# Altium PCB servo_shield.pcbdoc (part 1 of 2)
Units mil, origin at the board's own origin, x right, y up, seen from the top; angles counter-clockwise.
Board outline 4750.63 x 4655.55 mil, 4 copper layers (Top Layer, GND, PWR, Bottom Layer), stack 62.447 mil thick; 94 components, 126 nets, 466 pads, 102 vias.
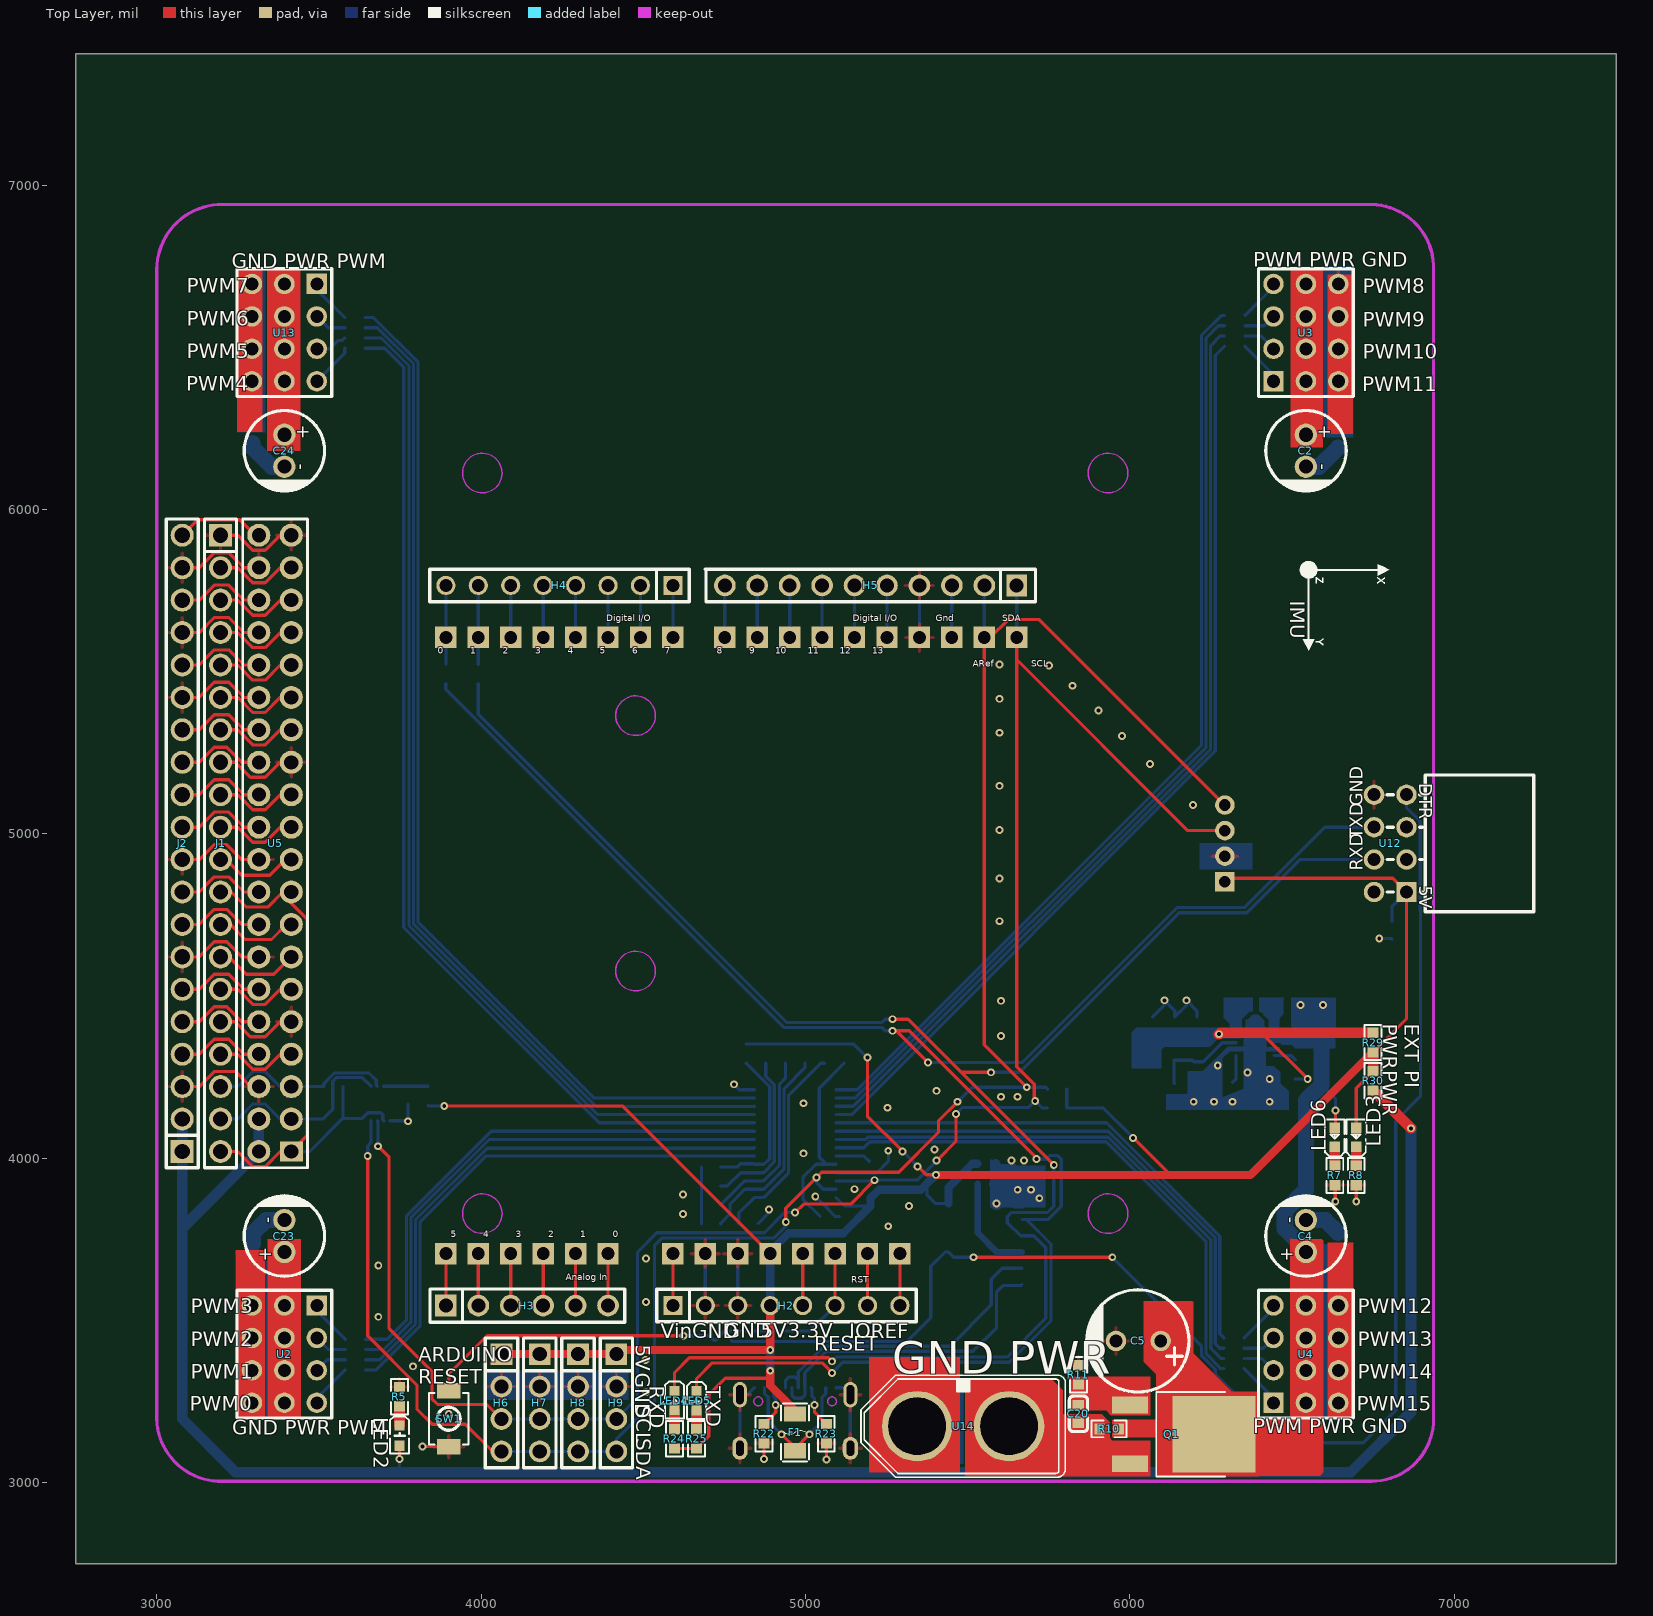
[diagram p0: Top Layer view]
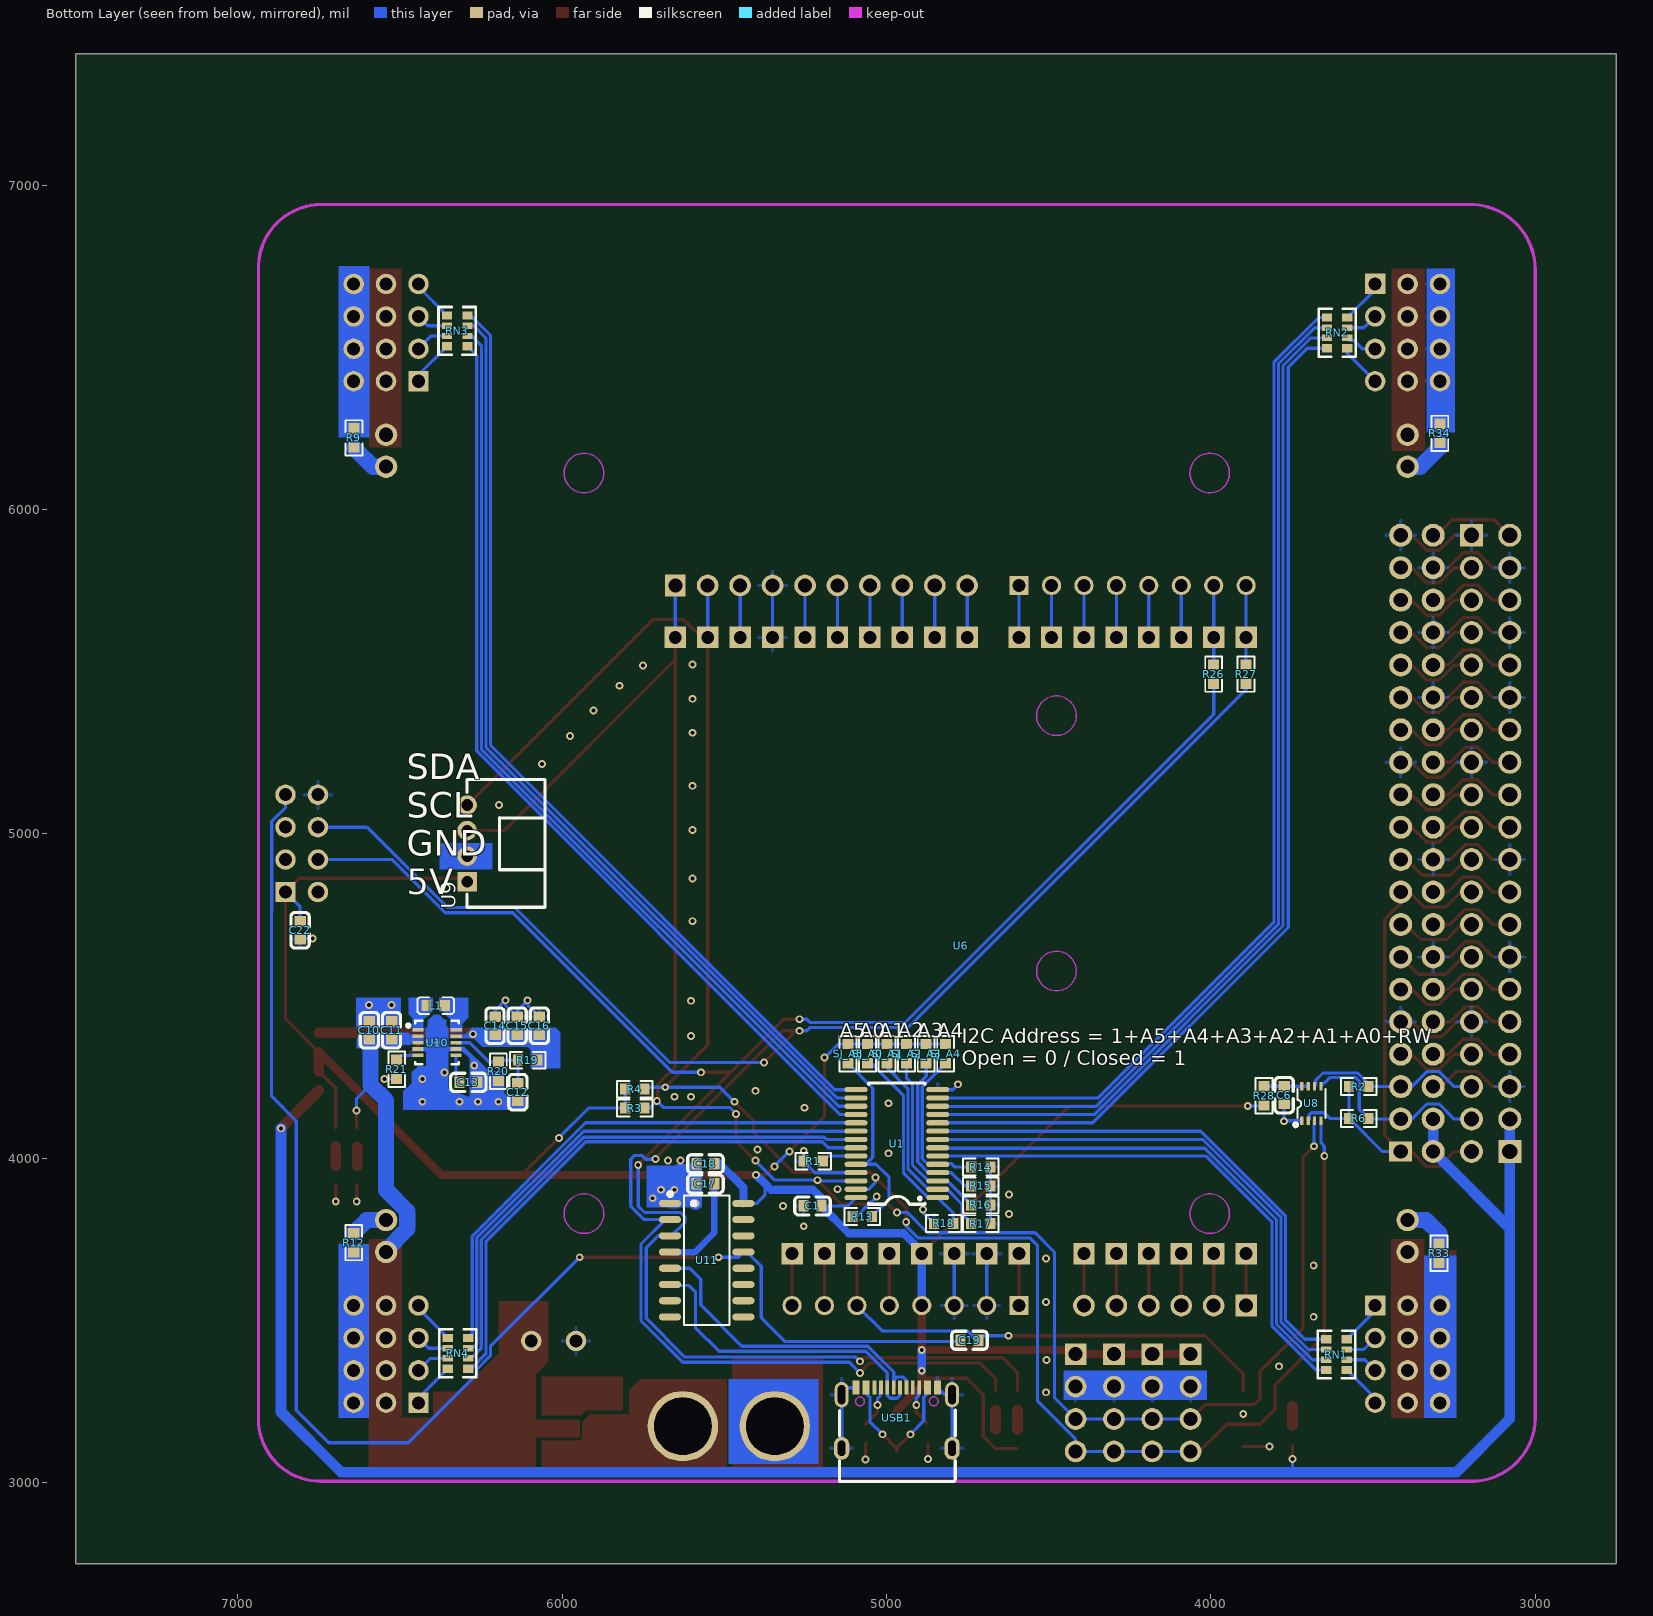
[diagram p1: Bottom Layer view, seen from below]
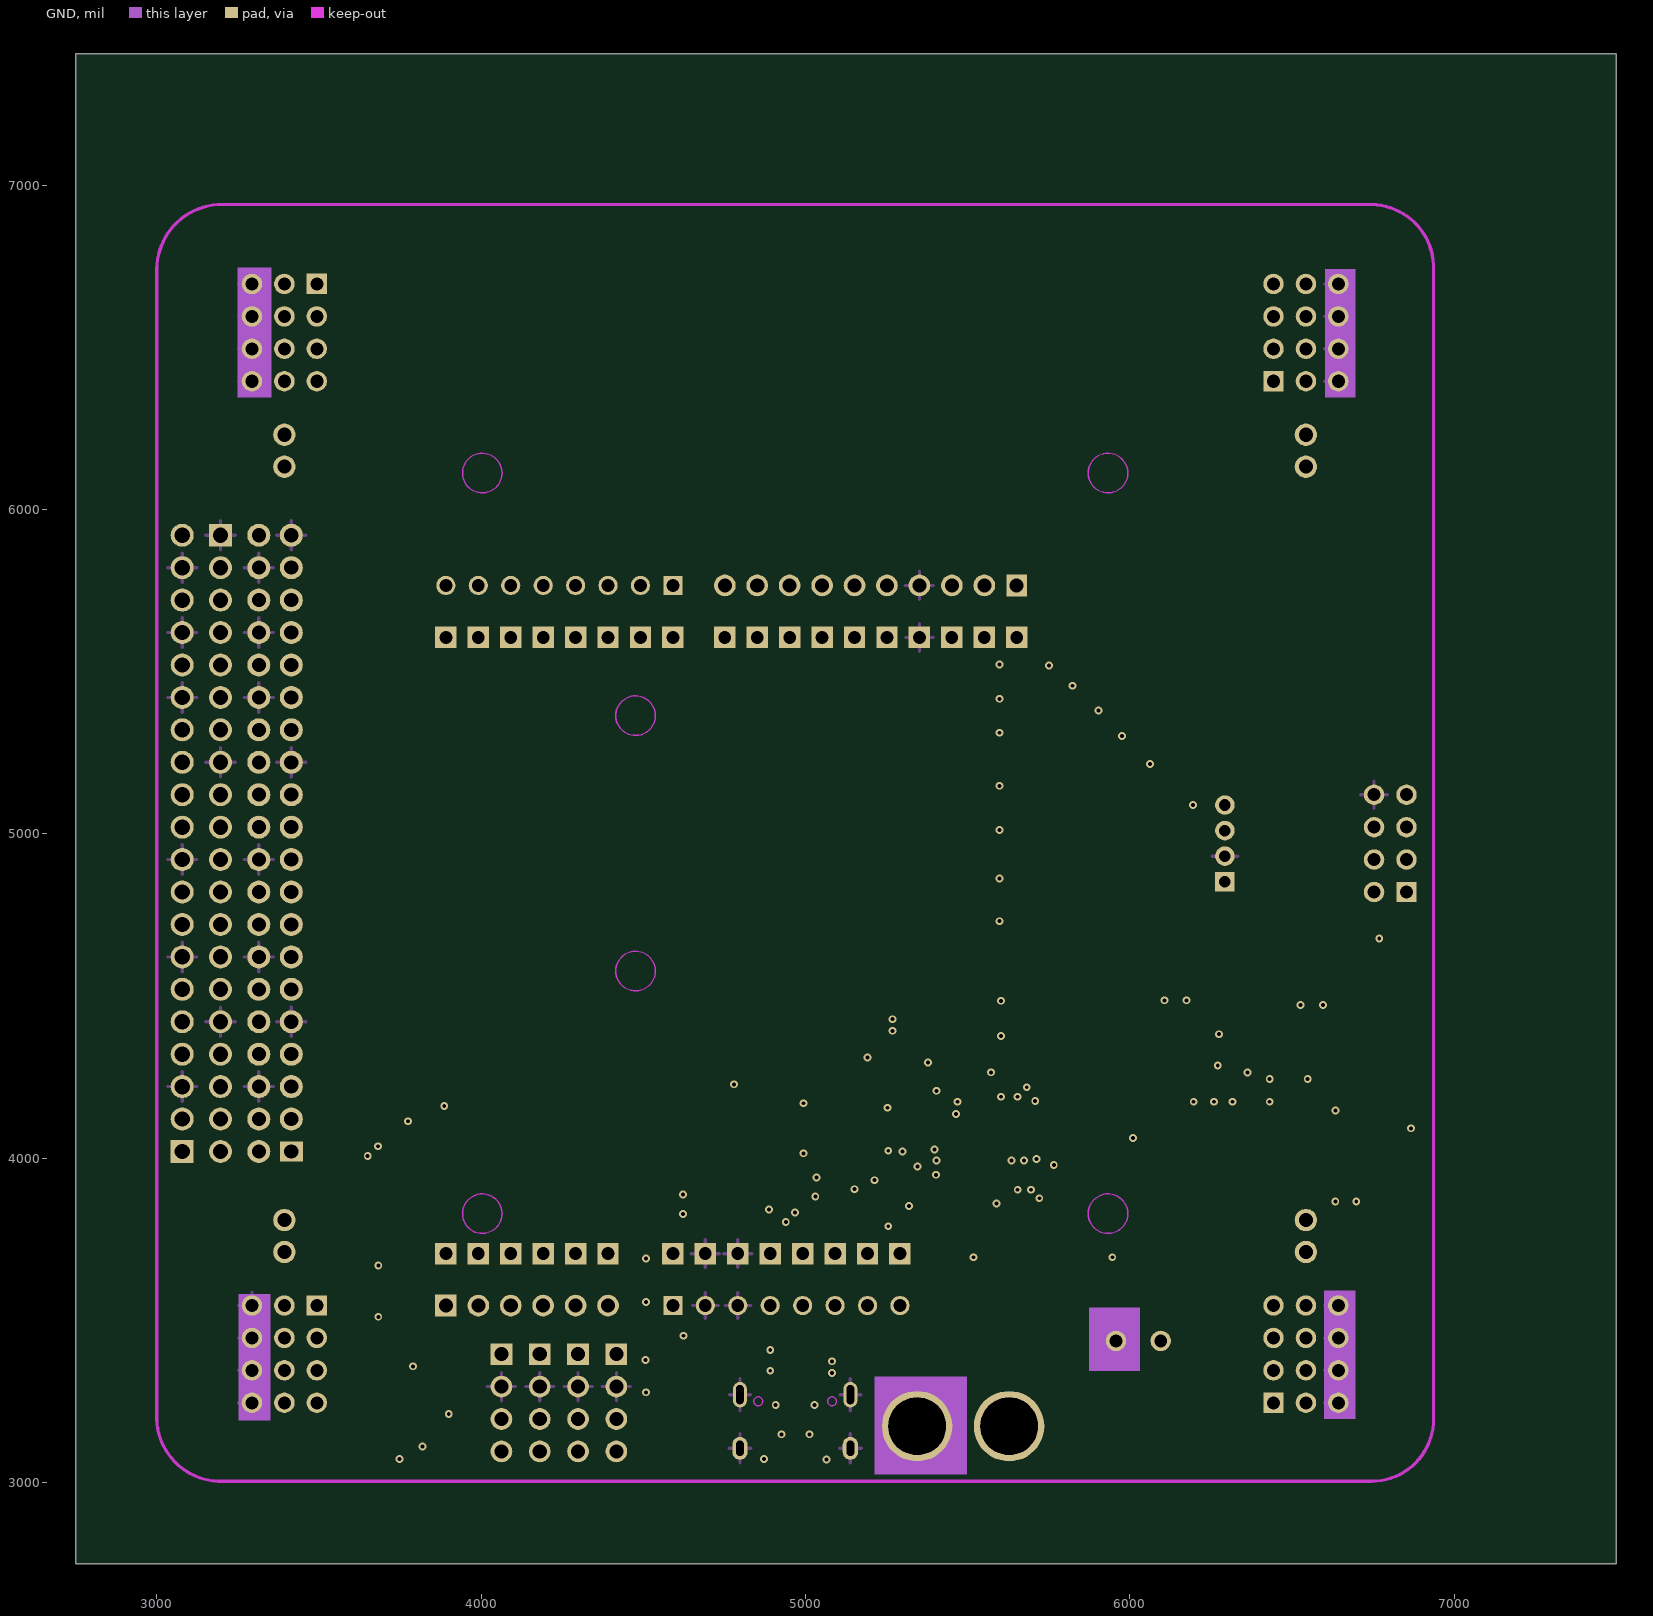
[diagram p2: GND]
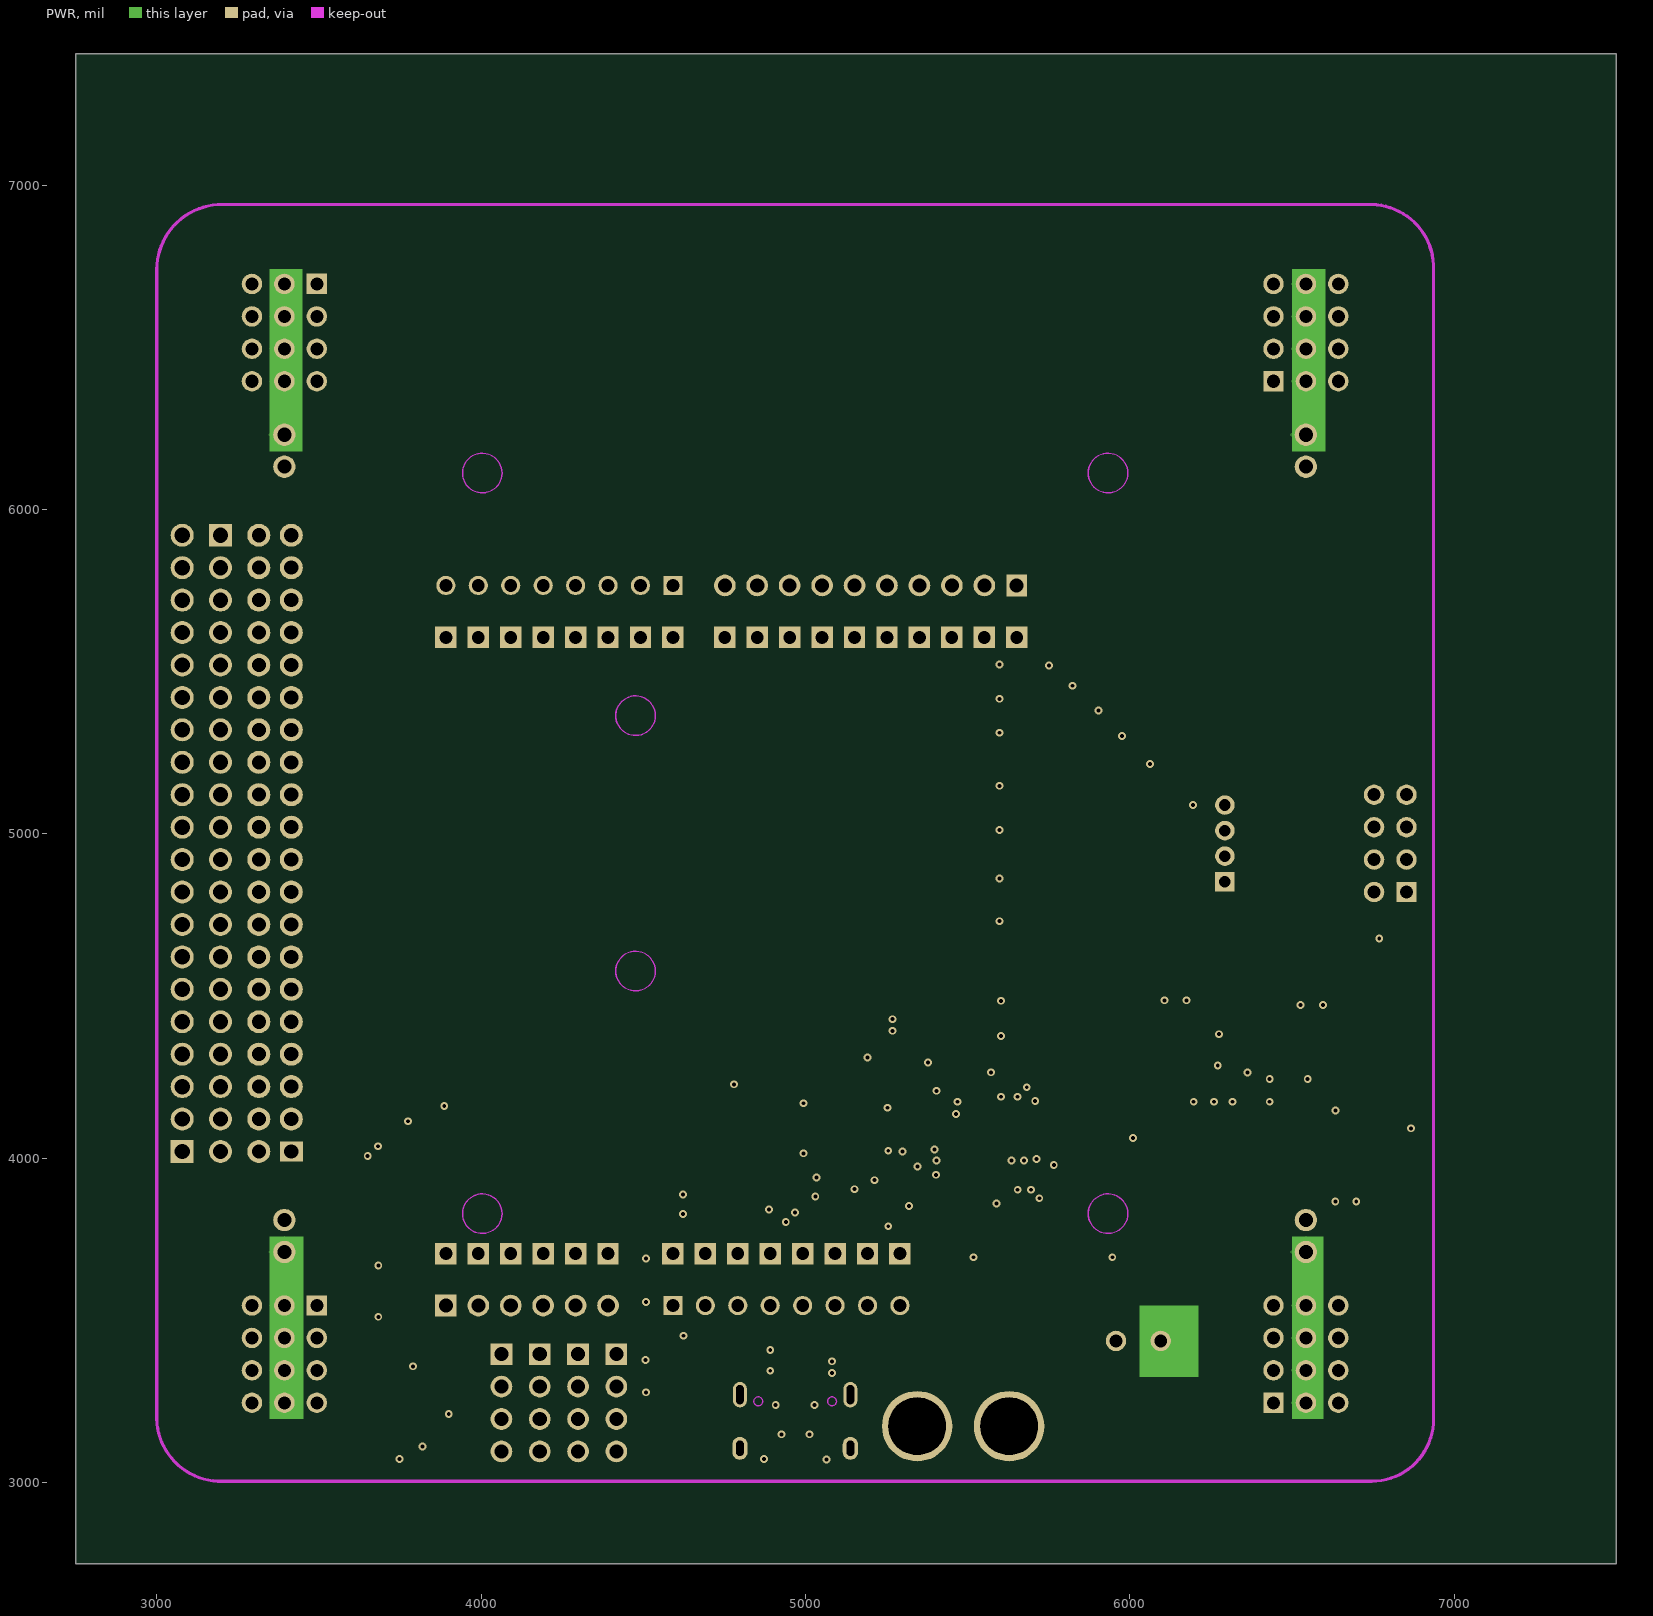
[diagram p3: PWR]

## Layer stack, top to bottom
Top Layer: signal copper 1.378
Dielectric1: surface 8.283, 7628 RC49% 8.6mil, Dk 0
GND: signal copper 0.598
Dielectric2: surface 41.929, 1.1mm H/HOZ Copper, Dk 0
PWR: signal copper 0.598
Dielectric3: surface 8.283, 7628 RC49% 8.6mil, Dk 0
Bottom Layer: signal copper 1.378

## Board outline
7500.63,2750 2750,2750 2750,7405.55 7500.63,7405.55

## Design rules (kind name [scope] priority, off if disabled: settings)
BoardOutlineClearance copperThickness1oz [All] p0: genericclearance=10 ignorepadtopadclearanceinfootprint=FALSE except(0: Arc-SplitContinuation Track-SplitContinuation SMDPad-SplitContinuation THPad-SplitContinuation Via-SplitContinuation Fill-SplitContinuation Poly-SplitContinuation Region-SplitContinuation Text-SplitContinuation)
BoardOutlineClearance copperThickness2oz [All] p0: genericclearance=10 ignorepadtopadclearanceinfootprint=FALSE except(0: Arc-SplitContinuation Track-SplitContinuation SMDPad-SplitContinuation THPad-SplitContinuation Via-SplitContinuation Fill-SplitContinuation Poly-SplitContinuation Region-SplitContinuation Text-SplitContinuation)
BoardOutlineClearance otherClearance [All] p0: genericclearance=10 ignorepadtopadclearanceinfootprint=FALSE except(0: Arc-SplitContinuation Track-SplitContinuation SMDPad-SplitContinuation THPad-SplitContinuation Via-SplitContinuation Fill-SplitContinuation Poly-SplitContinuation Region-SplitContinuation Text-SplitContinuation)
Clearance copperThickness1oz [All] p1: gap=7 ignorepadtopadclearanceinfootprint=FALSE
Clearance copperThickness2oz [All] p1: gap=7 ignorepadtopadclearanceinfootprint=FALSE
Clearance otherClearance [All] p1: gap=7 ignorepadtopadclearanceinfootprint=FALSE
DiffPairsRouting differentialPair [All] p1: maxuncoupledlength=10 minlimit=6 maxlimit=Infinity mostfreqgap=6 toplayer_minwidth=5 toplayer_prefwidth=10 toplayer_maxwidth=100 bottomlayer_minwidth=5 bottomlayer_prefwidth=10 bottomlayer_maxwidth=100 midlayer1_minwidth=5 midlayer1_prefwidth=10 midlayer1_maxwidth=100 midlayer2_minwidth=5 midlayer2_prefwidth=10 midlayer2_maxwidth=100
PasteMaskExpansion pasteMaskExpansion [All] p1: expansion=0
PlaneConnect innerPlane [All] p1: planeconnectstyle=Relief reliefexpansion=20 reliefentries=4 reliefconductorwidth=10 reliefairgap=10
PolygonConnect copperRegion [All] p1: connectstyle=Relief reliefentries=4 reliefconductorwidth=10 polygonreliefangle="90 Angle" airgapwidth=10
RoutingVias viaSize [All] p1: viastyle="Through Hole" holewidth=12.0078 minholewidth=11.811 maxholewidth=248.0314 width=12.0078 minwidth=11.811 maxwidth=248.0314
SolderMaskExpansion solderMaskExpansion [All] p1: useseparateexpansions=TRUE expansion=2 expansionbottom=2
Width copperThickness1oz [All] p1: maxlimit=100 minlimit=5 preferedwidth=10
Width copperThickness2oz [All] p1: maxlimit=100 minlimit=8 preferedwidth=10

## Components (designator, comment, footprint, x,y, rotation, side; value= is the part's Value field where it differs from the comment)
C1 "" C0603 5228.5,3852.51 r0 bottom
C2 "" CAP-TH_BD6.3-P2.50-D0.6-FD-1 6543.31,6181.14 r270 top
C4 "" CAP-TH_BD6.3-P2.50-D0.6-FD-1 6543.31,3759.88 r90 top
C5 "" CAP-TH_BD8.0-P3.50-D0.6-FD 6026.65,3436.5 r180 top
C6 "" C0603 3774.5,4194.11 r270 bottom
C10 "" C0603 6594.88,4394.25 r90 bottom
C11 "" C0603 6526.61,4394.25 r90 bottom
C12 "" C0603 6137.09,4203.5 r90 bottom
C13 "" C0603 6289.69,4233.62 r0 bottom
C14 "" C0603 6207.36,4408.31 r270 bottom
C15 "" C0603 6139.09,4408.31 r270 bottom
C16 "" C0603 6070.83,4408.31 r270 bottom
C17 "" C0603 5558.82,3920.39 r180 bottom
C18 "" C0603 5558.82,3982.64 r0 bottom
C19 "" C0603 4744.5,3438.51 r180 bottom
C20 "" C0603 5841.93,3211.61 r90 top
C22 "" C0603 6808.5,4702.51 r90 bottom
C23 "" CAP-TH_BD6.3-P2.50-D0.6-FD-1 3393.7,3759.88 r90 top
C24 "" CAP-TH_BD6.3-P2.50-D0.6-FD-1 3393.7,6181.14 r270 top
F1 "" F1206 4968.5,3154.51 r270 top
H2 "" HDR-TH_8P-P2.54-V-M 4941.65,3545.51 r0 top
H3 "" HDR-TH_6P-P2.54-V-M 4141.65,3545.51 r0 top
H4 "" HDR-TH_8P-P2.54-V-M 4241.65,5765.63 r180 top
H5 "" HDR-TH_10P-P2.54-V-M 5201.65,5765.63 r180 top
H6 "" HDR-TH_4P-P2.54-V-M 4062.99,3245.71 r270 top
H7 "" HDR-TH_4P-P2.54-V-M 4181.1,3245.71 r270 top
H8 "" HDR-TH_4P-P2.54-V-M 4299.21,3245.71 r270 top
H9 "" HDR-TH_4P-P2.54-V-M 4417.32,3245.71 r270 top
J1 "" HDR-TH_20P-P2.54-V-M-1 3196.85,4970.51 r270 top
J2 "" HDR-TH_20P-P2.54-V-M-1 3078.74,4970.51 r90 top
L1 "" L0603 6390.08,4470.55 r180 bottom
LED2 "" LED0603-R-RD_WHITE 3748.5,3144.51 r270 top
LED3 "" LED0603-RD 6698.5,4064.51 r90 top
LED4 "" LED0603-RD 4596.5,3252.61 r270 top
LED5 "" LED0603-R-RD 4664.5,3252.51 r270 top
LED6 "" LED0603-RD 6632.5,4064.51 r90 top
Q1 "" TO-252-2_L6.6-W6.1-P4.60-LS10.0-BR-CW 6130.3,3148.47 r180 top
R1 "" R0603 5226.5,3990.51 r0 bottom
R2 "" R0603 3544.5,4220.51 r0 bottom
R3 "" R0603 5776.5,4154.51 r0 bottom
R4 "" R0603 5776.5,4212.51 r0 bottom
R5 "" R0603 3748.5,3264.51 r90 top
R6 "" R0603 3544.5,4122.51 r0 bottom
R7 "" R0603 6632.5,3946.51 r270 top
R8 "" R0603 6698.5,3946.51 r270 top
R9 "" R0603 6642.5,6220.51 r270 bottom
R10 "" R0603 5936.3,3165.43 r180 top
R11 "" R0603 5841.93,3332.09 r270 top
R12 "" R0603 6643.07,3739.69 r90 bottom
R13 "" R0603 5074.92,3820 r180 bottom
R14 "" R0603 4709.49,3972.6 r0 bottom
R15 "" R0603 4709.49,3914.37 r0 bottom
R16 "" R0603 4709.49,3856.14 r0 bottom
R17 "" R0603 4709.49,3797.91 r0 bottom
R18 "" R0603 4824.5,3798.51 r180 bottom
R19 "" R0603 6106.97,4301.89 r180 bottom
R20 "" R0603 6197.32,4267.76 r270 bottom
R21 "" R0603 6510.55,4273.78 r90 bottom
R22 "" R0603 4872.5,3150.51 r90 top
R23 "" R0603 5064.5,3150.51 r90 top
R24 "" R0603 4596.5,3134.51 r270 top
R25 "" R0603 4664.5,3134.51 r270 top
R26 "" R0603 3991.6,5492.51 r270 bottom
R27 "" R0603 3891.6,5492.51 r270 bottom
R28 "" R0603 3836.5,4192.01 r270 bottom
R29 "" R0603 6750.5,4356.51 r270 top
R30 "" R0603 6750.5,4238.51 r270 top
R33 "" R0603 3296.5,3706.51 r90 bottom
R34 "" R0603 3294.5,6234.51 r270 bottom
RN1 "" RES-ARRAY-SMD_0603-8P-L3.2-W1.6-BL 3613.19,3394.33 r270 bottom
RN2 "" RES-ARRAY-SMD_0603-8P-L3.2-W1.6-BL 3611.18,6544.69 r270 bottom
RN3 "" RES-ARRAY-SMD_0603-8P-L3.2-W1.6-BL 6323.82,6550.71 r90 bottom
RN4 "" RES-ARRAY-SMD_0603-8P-L3.2-W1.6-BL 6321.81,3398.35 r90 bottom
SJ_A0 "" R0603 5058.86,4321.97 r270 bottom
SJ_A1 "" R0603 4998.62,4321.97 r270 bottom
SJ_A2 "" R0603 4938.39,4321.97 r270 bottom
SJ_A3 "" R0603 4878.15,4321.97 r270 bottom
SJ_A4 "" R0603 4817.91,4321.97 r270 bottom
SJ_A5 "" R0603 5119.09,4321.97 r270 bottom
SW1 "" SW-SMD_L3.9-W3.0-P4.45 3900.5,3196.51 r90 top
U1 "" TSSOP-28_L9.7-W4.4-P0.65-LS6.4-TL 4968.5,4044.88 r0 bottom
U2 "" HDR-TH_12P-P2.54-V-M-R4-C3-S2.54 3393.7,3395.71 r180 top
U3 "" HDR-TH_12P-P2.54-V-M-R4-C3-S2.54 6543.31,6545.31 r0 top
U4 "" HDR-TH_12P-P2.54-V-M-R4-C3-S2.54 6543.29,3395.7 r0 top
U5 "" HDR-TH_40P-P2.54-V-M-R2-C20-S2.54 3364.96,4970.51 r90 top
U6 "" ? 4771.65,4655.57 r180 bottom
U8 "" SSOP-8_L2.0-W2.3-P0.50-LS3.1-BR 3690.5,4168.51 r270 bottom
U9 "" CONN-TH_4P-P2.00_BX-PH2.0-4PWZ 6293.5,4970.51 r90 bottom
U10 "" WSON-10_L3.0-W3.0-P0.50-BL-EP-A 6386.06,4356.1 r270 bottom
U11 "" SOP-16_L10.0-W3.9-P1.27-LS6.0-BL 5554.8,3685.47 r270 bottom
U12 "" HDR-TH_8P-P2.54-H-F-R2-C4-S2.54-W8.5 6803.5,4970.51 r90 top
U13 "" HDR-TH_12P-P2.54-V-M-R4-C3-S2.54 3393.7,6545.31 r180 top
U14 "" CONN-TH_XT60PB-M 5486.54,3173.46 r0 top
USB1 "" USB-C-SMD_TYPE-C-6PIN-2MD-073 4968.5,3198.86 r180 bottom

## Footprints (in the part's own frame and the unit in brackets; to place one, negate y for a bottom-side part, rotate by r counter-clockwise, add the part's x,y. Pads: shape width x height; smd on the part's side, far side on the other; paste and mask are expansions set on the pad)
C0603 [mm]
  rect 0.8x0.9 smd: 1(-0.7,0) 2(0.7,0)
  silkscreen extent -1.39,-0.71 1.39,0.71
CAP-TH_BD6.3-P2.50-D0.6-FD-1 [mm]
  round 1.75 hole 1.1: 1(-1.25,0) 2(1.25,0)
  silkscreen extent -3.15,-3.15 3.21,3.15
CAP-TH_BD8.0-P3.50-D0.6-FD [mm]
  round 1.6 hole 1: 1(-1.75,0) 2(1.75,0)
  silkscreen extent -3.96,-4 4.04,4
CONN-TH_4P-P2.00_BX-PH2.0-4PWZ [mil]
  rect 60x60 hole 36: 1(-118.11,0)
  round 60 hole 36: 2(-39.37,0) 3(39.37,0) 4(118.11,0)
  silkscreen extent -197,-240 197,0
CONN-TH_XT60PB-M [mil]
  round 217.16 hole 177.16 slot 177.36 at 0 deg: 1(141.73,0) 2(-141.73,0)
  silkscreen extent -315,-158 315,158
F1206 [mm]
  rect 1.19x1.728 smd: 1(-1.445,0) 2(1.445,0)
  silkscreen extent -2.27,-1.09 2.27,1.09
HDR-TH_4P-P2.54-V-M [mm]
  rect 1.7x1.7 hole 1.1: 1(-3.81,0)
  round 1.7 hole 1.1: 2(-1.27,0) 3(1.27,0) 4(3.81,0)
  silkscreen extent -5.08,-1.27 5.08,1.27
HDR-TH_6P-P2.54-V-M [mm]
  rect 1.7x1.7 hole 1.1: 1(-6.35,0)
  round 1.7 hole 1.1: 2(-3.81,0) 3(-1.27,0) 4(1.27,0) 5(3.81,0) 6(6.35,0)
  silkscreen extent -7.6,-1.3 7.65,1.3
HDR-TH_8P-P2.54-H-F-R2-C4-S2.54-W8.5 [mm]
  rect 1.6x1.6 hole 1.02: 1(-3.81,-1.27)
  round 1.6 hole 1.02: 2(-3.81,1.27) 3(-1.27,-1.27) 4(-1.27,1.27) 5(1.27,-1.27) 6(1.27,1.27) 7(3.81,-1.27) 8(3.81,1.27)
  silkscreen extent -5.35,-11.23 5.35,0.24
HDR-TH_8P-P2.54-V-M [mm]
  rect 1.5x1.5 hole 1: 1(-8.89,0)
  round 1.5 hole 1: 2(-6.35,0) 3(-3.81,0) 4(-1.27,0) 5(1.27,0) 6(3.81,0) 7(6.35,0) 8(8.89,0)
  silkscreen extent -10.16,-1.27 10.16,1.27
HDR-TH_10P-P2.54-V-M [mm]
  rect 1.575x1.7 hole 1.1: 1(-11.43,0)
  round 1.7 hole 1.1: 2(-8.89,0) 3(-6.35,0) 4(-3.81,0) 5(-1.27,0) 6(1.27,0) 7(3.81,0) 8(6.35,0) 9(8.89,0) 10(11.43,0)
  silkscreen extent -12.9,-1.27 12.95,1.27
HDR-TH_12P-P2.54-V-M-R4-C3-S2.54 [mm]
  rect 1.6x1.6 hole 1.02: 1(-2.54,-3.81)
  round 1.6 hole 1.02: 2(-2.54,-1.27) 3(-2.54,1.27) 4(-2.54,3.81) 5(0,-3.81) 6(0,-1.27) 7(0,1.27) 8(0,3.81) 9(2.54,-3.81) 10(2.54,-1.27) 11(2.54,1.27) 12(2.54,3.81)
  silkscreen extent -3.71,-5 3.71,5
HDR-TH_20P-P2.54-V-M-1 [mm]
  rect 1.8x1.8 hole 1.2: 1(-24.13,0)
  round 1.8 hole 1.2: 2(-21.59,0) 3(-19.05,0) 4(-16.51,0) 5(-13.97,0) 6(-11.43,0) 7(-8.89,0) 8(-6.35,0) 9(-3.81,0) 10(-1.27,0) 11(1.27,0) 12(3.81,0) 13(6.35,0) 14(8.89,0) 15(11.43,0) 16(13.97,0) 17(16.51,0) 18(19.05,0) 19(21.59,0) 20(24.13,0)
  silkscreen extent -25.4,-1.25 25.4,1.25
HDR-TH_40P-P2.54-V-M-R2-C20-S2.54 [mm]
  rect 1.575x1.8 hole 1.1: 1(-24.13,-1.27)
  round 1.8 hole 1.1: 2(-24.13,1.27) 3(-21.59,-1.27) 4(-21.59,1.27) 5(-19.05,-1.27) 6(-19.05,1.27) 7(-16.51,-1.27) 8(-16.51,1.27) 9(-13.97,-1.27) 10(-13.97,1.27) 11(-11.43,-1.27) 12(-11.43,1.27) 13(-8.89,-1.27) 14(-8.89,1.27) 15(-6.35,-1.27) 16(-6.35,1.27) 17(-3.81,-1.27) 18(-3.81,1.27) 19(-1.27,-1.27) 20(-1.27,1.27) 21(1.27,-1.27) 22(1.27,1.27) 23(3.81,-1.27) 24(3.81,1.27) 25(6.35,-1.27) 26(6.35,1.27) 27(8.89,-1.27) 28(8.89,1.27) 29(11.43,-1.27) 30(11.43,1.27) 31(13.97,-1.27) 32(13.97,1.27) 33(16.51,-1.27) 34(16.51,1.27) 35(19.05,-1.27) 36(19.05,1.27) 37(21.59,-1.27) 38(21.59,1.27) 39(24.13,-1.27) 40(24.13,1.27)
  silkscreen extent -25.4,-2.54 25.4,2.54
L0603 [mm]
  rect 0.8x0.864 smd: 1(-0.7,0) 2(0.7,0)
  silkscreen extent -1.42,-0.65 1.42,0.65
LED0603-R-RD [mm]
  rect 0.8x0.8 smd: 1(0.751,0) 2(-0.751,0)
  silkscreen extent -1.44,-0.75 1.44,0.75
LED0603-R-RD_WHITE [mm]
  rect 0.8x0.8 smd: 1(0.8,0) 2(-0.8,0)
  silkscreen extent -1.49,-0.75 1.39,0.76
LED0603-RD [mm]
  rect 0.8x0.8 smd: 1(-0.749,0) 2(0.749,0)
  silkscreen extent -1.49,-0.75 1.39,0.76
R0603 [mil]
  rect 31.75x34.02 smd: 1(-29.66,0) 2(29.66,0)
  silkscreen extent -55,-26 55,26
RES-ARRAY-SMD_0603-8P-L3.2-W1.6-BL [mm]
  rect 0.65x0.8 smd: 1(-1.2,-0.8) 4(1.2,-0.8) 5(1.2,0.8) 8(-1.2,0.8)
  rect 0.5x0.8 smd: 2(-0.4,-0.8) 3(0.4,-0.8) 6(0.4,0.8) 7(-0.4,0.8)
  silkscreen extent -1.87,-1.45 1.87,1.47
SOP-16_L10.0-W3.9-P1.27-LS6.0-BL [mm]
  oval 0.56x1.745 smd: 1(-4.445,-2.872) 2(-3.175,-2.872) 3(-1.905,-2.872) 4(-0.635,-2.872) 5(0.635,-2.872) 6(1.905,-2.872) 7(3.175,-2.872) 8(4.445,-2.872) 9(4.445,2.872) 10(3.175,2.872) 11(1.905,2.872) 12(0.635,2.872) 13(-0.635,2.872) 14(-1.905,2.872) 15(-3.175,2.872) 16(-4.445,2.872)
  silkscreen extent -5.33,-3.02 5.08,1.77
SSOP-8_L2.0-W2.3-P0.50-LS3.1-BR [mm]
  rect 0.7x0.26 smd: 1(1.35,-0.75) 2(1.35,-0.25) 3(1.35,0.25) 4(1.35,0.75) 5(-1.35,0.75) 6(-1.35,0.25) 7(-1.35,-0.25) 8(-1.35,-0.75)
  silkscreen extent -1.15,-1.37 1.81,1.1
SW-SMD_L3.9-W3.0-P4.45 [mm]
  rect 1.23x1.86 smd: 1(-2.185,0) 2(2.185,0)
  silkscreen extent -2.03,-1.54 2.03,1.54
TO-252-2_L6.6-W6.1-P4.60-LS10.0-BR-CW [mm]
  rect 2.8x1.3 smd: 1(3.292,-2.3) 3(3.292,2.3)
  rect 6.5x6 smd: 2(-3.292,0)
  silkscreen extent -4.17,-3.3 1.23,3.3
TSSOP-28_L9.7-W4.4-P0.65-LS6.4-TL [mil]
  oval 71x16 smd: 1(-125.98,166.35) 2(-125.98,140.76) 3(-125.98,115.16) 4(-125.98,89.57) 5(-125.98,63.97) 6(-125.98,38.39) 7(-125.98,12.8) 8(-125.98,-12.8) 9(-125.98,-38.38) 10(-125.98,-63.97) 11(-125.98,-89.57) 12(-125.98,-115.16) 13(-125.98,-140.75) 14(-125.98,-166.34) 15(125.98,-166.34) 16(125.98,-140.75) 17(125.98,-115.16) 18(125.98,-89.57) 19(125.98,-63.97) 20(125.98,-38.38) 21(125.98,-12.8) 22(125.98,12.8) 23(125.98,38.39) 24(125.98,63.97) 25(125.98,89.57) 26(125.98,115.16) 27(125.98,140.74) 28(125.98,166.34)
  silkscreen extent -87,-187 87,187
USB-C-SMD_TYPE-C-6PIN-2MD-073 [mm]
  rect 0.55x1.1 smd: 1(-3.2,2.375) 2(-2.4,2.375) 11(2.4,2.375) 12(3.2,2.375)
  rect 0.3x1.1 smd: 3(-1.75,2.375) 4(-1.25,2.375) 5(-0.75,2.375) 6(-0.25,2.375) 7(0.25,2.375) 8(0.75,2.375) 9(1.25,2.375) 10(1.75,2.375)
  oval 1.2x1.8 hole 0.6 slot 1.2 at 90 deg: 13(-4.325,-2.375) 14(4.325,-2.375)
  oval 1.1x2 hole 0.6 slot 1.5 at 90 deg: 13(-4.325,1.825) 14(4.325,1.825)
  Board Outline Layer circle w0.003: c-2.89,1.305 r0.35
  Board Outline Layer circle w0.003: c2.89,1.305 r0.35
  Board Outline Layer region: -3.24,1.305 -3.205,1.153 -3.108,1.031 -2.968,0.964 -2.812,0.964 -2.672,1.031 -2.575,1.153 -2.54,1.305 -2.54,1.305 -2.575,1.457 -2.672,1.579 -2.812,1.646 -2.968,1.646 -3.108,1.579 -3.205,1.457 -3.24,1.305
  Board Outline Layer region: -3.24,1.305 -3.205,1.153 -3.108,1.031 -2.968,0.964 -2.812,0.964 -2.672,1.031 -2.575,1.153 -2.54,1.305 -2.54,1.305 -2.575,1.457 -2.672,1.579 -2.812,1.646 -2.968,1.646 -3.108,1.579 -3.205,1.457 -3.24,1.305
  Board Outline Layer region: 2.54,1.305 2.575,1.153 2.672,1.031 2.812,0.964 2.968,0.964 3.108,1.031 3.205,1.153 3.24,1.305 3.24,1.305 3.205,1.457 3.108,1.579 2.968,1.646 2.812,1.646 2.672,1.579 2.575,1.457 2.54,1.305
  Board Outline Layer region: 2.54,1.305 2.575,1.153 2.672,1.031 2.812,0.964 2.968,0.964 3.108,1.031 3.205,1.153 3.24,1.305 3.24,1.305 3.205,1.457 3.108,1.579 2.968,1.646 2.812,1.646 2.672,1.579 2.575,1.457 2.54,1.305
  silkscreen extent -4.5,-4.97 4.57,0.6
WSON-10_L3.0-W3.0-P0.50-BL-EP-A [mm]
  rect 0.28x0.876 smd: 1(-1,-1.5) 2(-0.5,-1.5) 3(0,-1.5) 4(0.5,-1.5) 5(1,-1.5) 6(0.999,1.474) 7(0.499,1.473) 8(-0.001,1.473) 9(-0.5,1.5) 10(-1,1.5)
  round 0.34 smd: 11(0,0)
  Top Layer region: 1.074,0.7 1.074,0.85 -1.076,0.85 -1.076,0.7 -1.775,0.7 -1.775,0.5 -1.076,0.5 -1.076,0.3 -1.775,0.3 -1.775,0.1 -1.076,0.1 -1.076,-0.1 -1.775,-0.1 -1.775,-0.3 -1.076,-0.3 -1.076,-0.5 -1.775,-0.5 -1.775,-0.7 -1.076,-0.7 -1.076,-0.85 1.074,-0.85 1.074,-0.7 1.775,-0.7 1.775,-0.5 1.075,-0.5 1.075,-0.3 1.775,-0.3 1.775,-0.1 1.074,-0.1 1.074,0.1 1.775,0.1 1.775,0.3 1.074,0.3 1.074,0.5 1.775,0.5 1.775,0.7
  silkscreen extent -1.7,-2.38 1.7,1.7
? [mil]
  rect 66x66 hole 39.4: 3V(-220,-950) 5V(-120,-950) A0(380,-950) A1(480,-950) A2(580,-950) A3(680,-950) A4(780,-950) A5(880,-950) AREF(-680,950) D0(880,950) D1(780,950) D2(680,950) D3(580,950) D4(480,950) D5(380,950) D6(280,950) D7(180,950) D8(20,950) D9(-80,950) D10(-180,950) D11(-280,950) D12(-380,950) D13(-480,950) GND(-580,950) GND1(80,-950) GND2(-20,-950) IOREF(-420,-950) RESERVED(-520,-950) RESET(-320,-950) SCL(-880,950) SDA(-780,950) VIN(180,-950)

## Via types
v1: diameter 24.02, hole 12.01, Top Layer to Bottom Layer, 102 vias

## Nets (pads, with @x,y where several pads share a name; then routed paths per layer and width w, separated by ;. In a path a pad name is that pad's centre, name@x,y a point inside that pad or via, vN(x,y) a via of type N, cw(c..) or ccw(c..) an arc to the next point about the centre after c; other vN are vias at no path point)
3V3: J1.12 J1.20 R2.2 R6.2 U5.1 U5.17 U8.2 | length 1806.1
  Top Layer w10: J1.20@3196.85,4020.51 3249.32,4020.51 3295.73,3974.09 3334.19,3974.09 3380.6,4020.51 U5.1@3414.96,4020.51 3464.61,4070.16 3464.61,4736.51 3414.96,4786.16 U5.17@3414.96,4820.51 3388.5,4820.51 3342.09,4774.09 3276.92,4774.09 3230.5,4820.51 J1.12@3196.85,4820.51
  Bottom Layer w10: U5.1@3414.96,4020.51 3472.16,4020.51 R6.2@3574.16,4122.51 ; R2.2@3574.16,4220.51 R6.2@3574.16,4122.51 ; U8.2@3700.34,4115.37 3696.76,4118.94 3696.76,4133.7 3690.33,4140.13 3651.3,4140.13 3633.68,4122.51 R6.2@3574.16,4122.51
$1N714: R1.1 U1.23 | length 109
  Bottom Layer w10: U1.23@5094.48,4006.5 5180.86,4006.5 R1.1@5196.84,3990.51
$1N2513: LED3.1 R8.1 | length 58.8
  Top Layer w33: R8.1@6698.5,3976.17 LED3.1@6698.51,4035.02
$1N4754: RN1.8 U2.1 | length 140.6
  Bottom Layer w10: U2.1@3493.7,3545.71 3493.7,3529.56 RN1.8@3581.69,3441.57
$1N4756: RN1.7 U2.2 | length 102.7
  Bottom Layer w10: U2.2@3493.7,3445.71 3529.33,3410.08 RN1.7@3581.69,3410.08
$1N4758: RN1.6 U2.3 | length 101.6
  Bottom Layer w10: U2.3@3493.7,3345.71 3526.57,3378.58 RN1.6@3581.69,3378.58
$1N4760: RN1.5 U2.4 | length 137.8
  Bottom Layer w10: U2.4@3493.7,3245.71 3493.7,3259.1 RN1.5@3581.69,3347.09
$1N7211: H4.8 R27.1 U6.D0 | length 243.4
  Bottom Layer w10: R27.1@3891.6,5522.17 U6.D0@3891.65,5605.57 H4.8@3891.65,5765.63
$1N7213: H4.7 R26.1 U6.D1 | length 243.4
  Bottom Layer w10: R26.1@3991.6,5522.17 U6.D1@3991.6,5605.53 ; U6.D1@3991.65,5605.57 H4.7@3991.65,5765.63
$1N7215: H4.6 U6.D2 | length 160.1
  Bottom Layer w10: U6.D2@4091.65,5605.57 H4.6@4091.65,5765.62
$1N7217: H4.5 U6.D3 | length 160.1
  Bottom Layer w10: U6.D3@4191.65,5605.57 H4.5@4191.65,5765.63
$1N7219: H4.4 U6.D4 | length 160.1
  Bottom Layer w10: U6.D4@4291.65,5605.57 H4.4@4291.65,5765.63
$1N7221: H4.3 U6.D5 | length 160.1
  Bottom Layer w10: U6.D5@4391.65,5605.57 H4.3@4391.65,5765.63
$1N7223: H4.2 U6.D6 | length 160.1
  Bottom Layer w10: U6.D6@4491.65,5605.57 H4.2@4491.65,5765.63
$1N7225: H4.1 U6.D7 | length 160.1
  Bottom Layer w10: U6.D7@4591.65,5605.57 H4.1@4591.65,5765.63
$1N8317: H2.1 U6.VIN | length 160
  Top Layer w10: H2.1@4591.65,3545.51 U6.VIN@4591.65,3705.56
$1N8325: H2.5 U6.3V | length 160
  Top Layer w10: H2.5@4991.65,3545.52 U6.3V@4991.65,3705.57
$1N8333: H3.6 U6.A0 | length 160
  Top Layer w10: H3.6@4391.65,3545.51 U6.A0@4391.65,3705.56
$1N8335: H3.5 U6.A1 | length 160
  Top Layer w10: H3.5@4291.65,3545.52 U6.A1@4291.65,3705.57
$1N8337: H3.4 U6.A2 | length 160
  Top Layer w10: H3.4@4191.65,3545.51 U6.A2@4191.65,3705.56
$1N8339: H3.3 U6.A3 | length 160
  Top Layer w10: H3.3@4091.65,3545.51 U6.A3@4091.65,3705.56
$1N8341: H3.2 U6.A4 | length 160
  Top Layer w10: H3.2@3991.65,3545.51 U6.A4@3991.65,3705.56
$1N8343: H3.1 U6.A5 | length 160
  Top Layer w10: H3.1@3891.65,3545.52 U6.A5@3891.65,3705.57
$1N8373: H5.3 U6.AREF | length 160.1
  Bottom Layer w10: U6.AREF@5451.65,5605.57 H5.3@5451.65,5765.63
$1N8377: H5.5 U6.D13 | length 160.1
  Bottom Layer w10: U6.D13@5251.65,5605.57 H5.5@5251.65,5765.63
$1N8379: H5.6 U6.D12 | length 160.1
  Bottom Layer w10: U6.D12@5151.65,5605.57 H5.6@5151.65,5765.62
$1N8381: H5.7 U6.D11 | length 160.1
  Bottom Layer w10: U6.D11@5051.65,5605.57 H5.7@5051.65,5765.63
$1N8383: H5.8 U6.D10 | length 160.1
  Bottom Layer w10: U6.D10@4951.65,5605.57 H5.8@4951.65,5765.62
$1N8385: H5.9 U6.D9 | length 160.1
  Bottom Layer w10: U6.D9@4851.65,5605.57 H5.9@4851.65,5765.63
$1N8387: H5.10 U6.D8 | length 160.1
  Bottom Layer w10: U6.D8@4751.65,5605.57 H5.10@4751.65,5765.62
$1N8744: C20.1 Q1.3 R10.2 U14.1
$1N9829: L1.1 U10.1
$1N9842: L1.2 U10.10
$1N10149: C12.2 R19.1 R20.1 U10.8 | length 288.6
  Bottom Layer w10: C12.2@6137.09,4231.06 6136.63,4231.52 R19.1@6136.63,4301.89 6192.85,4301.89 R20.1@6197.32,4297.42 6226.98,4297.42 6285.69,4356.13 U10.8@6328.08,4356.13
$1N10374: C13.2 U10.6 | length 87.6
  Bottom Layer w10: C13.2@6317.24,4233.62 6328.04,4244.42 U10.6@6328.04,4316.76
$1N10415: R21.2 U10.5 | length 70.9
  Bottom Layer w10: U10.5@6445.12,4316.74 6497.25,4316.74 R21.2@6510.55,4303.44
$1N10421: C14.2 C15.2 C16.2 R19.2 R21.1 R29.1 U10.9 | length 709.9
  Top Layer w10: 6410.62,4382.2 v1(6548.7,4244.12)
  Top Layer w33: v1(6275.63,4382.2) 6279.6,4386.17 R29.1@6750.5,4386.17
  Bottom Layer w10: R21.1@6510.55,4244.12 v1(6548.7,4244.12)
$1N12624: R22.2 USB1.10 | length 130.8
  Top Layer w10: R22.2@4872.5,3180.17 4908.5,3216.17 v1(4908.5,3238.51)
  Bottom Layer w10: USB1.10@4899.6,3292.36 4902.4,3289.56 4902.4,3266.16 4908.5,3260.06 v1(4908.5,3238.51)
$1N12629: R23.2 USB1.4 | length 131.6
  Top Layer w10: v1(5028.5,3238.51) 5028.5,3216.17 R23.2@5064.5,3180.17
  Bottom Layer w10: USB1.4@5017.71,3292.36 5020.51,3289.56 5020.51,3266.16 5028.5,3258.17 v1(5028.5,3238.51)
$1N14755: C17.2 U11.4 | length 311.8
  Bottom Layer w20: C17.2@5531.26,3920.39 5531.26,3769.76 5590.5,3710.51 ; 5590.54,3710.47 U11.4@5667.89,3710.47
$1N15203: LED5.1 R25.1 | length 58.8
  Top Layer w33: R25.1@4664.5,3164.17 LED5.1@4664.5,3222.94
$1N15207: LED4.2 R24.1 | length 58.9
  Top Layer w33: R24.1@4596.5,3164.17 LED4.2@4596.51,3223.12
$1N16062: F1.2 USB1.2 USB1.11 | length 460.9
  Top Layer w10: v1(4926.5,3148.51) 4968.5,3106.51 F1.2@4968.5,3104.51 ; F1.2@4968.5,3097.62 F1.2@4968.5,3104.51 ; v1(5012.5,3148.51) F1.2@4968.5,3104.51
  Bottom Layer w10: USB1.11@4874.01,3292.36 4874.01,3274.21 4885.31,3262.9 4885.31,3189.71 v1(4926.5,3148.51) ; v1(5012.5,3148.51) 5051.69,3187.7 5051.69,3262.9 5062.99,3274.21 USB1.2@5062.99,3292.36
$1N19247: C19.2 H2.6 SW1.2 U6.RESET | length 1502.2
  Top Layer w10: SW1.2@3900.5,3282.53 3900.5,3334.51 4018.5,3452.51 v1(4624.5,3452.51) ; H2.6@5091.65,3545.51 U6.RESET@5091.65,3705.56
  Bottom Layer w10: v1(4624.5,3452.51) 4702.94,3452.51 C19.2@4716.94,3438.51 4723.07,3438.51 4751.77,3467.21 5013.35,3467.21 H2.6@5091.65,3545.51
$1N19249: H2.8 U6.RESERVED | length 160
  Top Layer w10: H2.8@5291.65,3545.51 U6.RESERVED@5291.65,3705.56
$1N19251: H2.7 U6.IOREF | length 160
  Top Layer w10: H2.7@5191.65,3545.52 U6.IOREF@5191.65,3705.57
$1N24481: C23.2 R33.2 | length 146.3
  Bottom Layer w50: R33.2@3296.5,3736.17 3296.5,3768.51 3337.08,3809.09 C23.2@3393.7,3809.09
$1N24740: RN2.8 U13.1 | length 139
  Bottom Layer w10: U13.1@3493.7,6695.31 3493.7,6677.91 RN2.8@3579.69,6591.93
$1N24741: RN2.7 U13.2 | length 100.4
  Bottom Layer w10: U13.2@3493.7,6595.31 3528.58,6560.44 RN2.7@3579.69,6560.44
$1N24742: RN2.6 U13.3 | length 99.9
  Bottom Layer w10: U13.3@3493.7,6495.31 3533.48,6495.31 3559.39,6521.22 3571.97,6521.22 RN2.6@3579.69,6528.94
$1N24743: RN2.5 U13.4 | length 137.7
  Bottom Layer w10: U13.4@3493.7,6395.31 3579.69,6481.3 RN2.5@3579.69,6497.45
$1N24753: C24.2 R34.2 | length 137
  Bottom Layer w50: R34.2@3294.5,6204.85 3294.5,6191.96 3354.53,6131.93 C24.2@3393.7,6131.93
$1N27818: RN3.8 U3.1 | length 144.6
  Bottom Layer w10: RN3.8@6355.31,6503.47 6443.31,6415.48 U3.1@6443.31,6395.32
$1N27819: RN3.7 U3.2 | length 104.4
  Bottom Layer w10: RN3.7@6355.31,6534.96 6403.66,6534.96 U3.2@6443.31,6495.32
$1N27820: RN3.6 U3.3 | length 99.9
  Bottom Layer w10: RN3.6@6355.31,6566.46 6414.45,6566.46 U3.3@6443.31,6595.32
$1N27821: RN3.5 U3.4 | length 133.8
  Bottom Layer w10: RN3.5@6355.31,6597.95 6443.31,6685.94 U3.4@6443.31,6695.31
$1N27831: C2.2 R9.2 | length 123.6
  Bottom Layer w50: C2.2@6543.31,6131.93 6583.58,6131.93 R9.2@6642.5,6190.85
$1N28071: RN4.8 U4.1 | length 142.7
  Bottom Layer w10: RN4.8@6353.31,3351.11 6443.29,3261.12 U4.1@6443.29,3245.7
$1N28072: RN4.7 U4.2 | length 105.3
  Bottom Layer w10: RN4.7@6353.31,3382.6 6406.4,3382.6 U4.2@6443.29,3345.7
$1N28073: RN4.6 U4.3 | length 103.1
  Bottom Layer w10: RN4.6@6353.31,3414.1 6411.68,3414.1 U4.3@6443.29,3445.7
$1N28074: RN4.5 U4.4 | length 137.4
  Bottom Layer w10: RN4.5@6353.31,3445.59 6443.29,3535.57 U4.4@6443.29,3545.7
$1N28084: C4.2 R12.2 | length 116.2
  Bottom Layer w50: C4.2@6543.31,3809.09 6603.32,3809.09 R12.2@6643.07,3769.35
$1N33264: LED6.1 R7.1 | length 58.8
  Top Layer w33: R7.1@6632.5,3976.17 LED6.1@6632.51,4035.02
$1N33267: LED2.2 R5.1 | length 58.8
  Top Layer w33: LED2.2@3748.5,3176.01 R5.1@3748.5,3234.85
$1N33274: J1.2 U5.37 | length 256.6
  Top Layer w10: J1.2@3196.85,5820.51 3249.32,5820.51 3295.73,5774.09 3334.19,5774.09 3380.6,5820.51 U5.37@3414.96,5820.51
$1N33275: J1.3 U5.35 | length 256.6
  Top Layer w10: J1.3@3196.85,5720.51 3249.32,5720.51 3295.73,5674.09 3334.19,5674.09 3380.6,5720.51 U5.35@3414.96,5720.51
$1N33276: J1.4 U5.33 | length 256.6
  Top Layer w10: J1.4@3196.85,5620.51 3249.32,5620.51 3295.73,5574.09 3334.19,5574.09 3380.6,5620.51 U5.33@3414.96,5620.51
$1N33277: J1.5 U5.31 | length 256.6
  Top Layer w10: J1.5@3196.85,5520.51 3249.32,5520.51 3295.73,5474.09 3334.19,5474.09 3380.6,5520.51 U5.31@3414.96,5520.51
$1N33278: J1.6 U5.29 | length 256.6
  Top Layer w10: J1.6@3196.85,5420.51 3249.32,5420.51 3295.73,5374.09 3334.19,5374.09 3380.6,5420.51 U5.29@3414.96,5420.51
$1N33279: J1.7 U5.27 | length 256.6
  Top Layer w10: J1.7@3196.85,5320.51 3249.32,5320.51 3295.73,5274.09 3334.19,5274.09 3380.6,5320.51 U5.27@3414.96,5320.51
$1N33281: J1.9 U5.23 | length 256.6
  Top Layer w10: J1.9@3196.85,5120.51 3249.32,5120.51 3295.73,5074.09 3334.19,5074.09 3380.6,5120.51 U5.23@3414.96,5120.51
$1N33282: J1.10 U5.21 | length 256.6
  Top Layer w10: J1.10@3196.85,5020.51 3249.32,5020.51 3295.73,4974.09 3334.19,4974.09 3380.6,5020.51 U5.21@3414.96,5020.51
$1N33283: J1.11 U5.19 | length 257.9
  Top Layer w10: J1.11@3196.85,4920.51 3214.5,4920.51 3262.5,4872.51 3348.5,4872.51 3396.5,4920.51 U5.19@3414.96,4920.51
$1N33285: J1.13 U5.15 | length 256.6
  Top Layer w10: J1.13@3196.85,4720.51 3226.5,4720.51 3272.92,4674.09 3354.09,4674.09 3400.5,4720.51 U5.15@3414.96,4720.51
$1N33286: J1.14 U5.13 | length 262.5
  Top Layer w10: J1.14@3196.85,4620.51 3222.5,4620.51 3276.09,4566.93 3361.38,4566.93 U5.13@3414.96,4620.51
$1N33287: J1.15 U5.11 | length 256.6
  Top Layer w10: J1.15@3196.85,4520.51 3249.32,4520.51 3295.73,4474.09 3334.19,4474.09 3380.6,4520.51 U5.11@3414.96,4520.51
$1N33289: J1.17 U5.7 | length 256.6
  Top Layer w10: J1.17@3196.85,4320.51 3249.32,4320.51 3295.73,4274.09 3334.19,4274.09 3380.6,4320.51 U5.7@3414.96,4320.51
$1N33296: J2.4 U5.8 | length 274.7
  Top Layer w10: J2.4@3078.74,4320.51 3131.21,4320.51 3177.62,4366.93 3222.72,4366.93 3269.14,4320.51 U5.8@3314.96,4320.51
$1N33297: J2.5 U5.10 | length 274.7
  Top Layer w10: J2.5@3078.74,4420.51 3131.21,4420.51 3177.62,4466.93 3216.08,4466.93 3262.49,4420.51 U5.10@3314.96,4420.51
$1N33298: J2.6 U5.12 | length 274.7
  Top Layer w10: J2.6@3078.74,4520.51 3131.21,4520.51 3177.62,4566.93 3222.72,4566.93 3269.14,4520.51 U5.12@3314.96,4520.51
$1N33300: J2.8 U5.16 | length 274.7
  Top Layer w10: J2.8@3078.74,4720.51 3131.21,4720.51 3177.62,4766.93 3216.08,4766.93 3262.49,4720.51 U5.16@3314.96,4720.51
$1N33301: J2.9 U5.18 | length 274.7
  Top Layer w10: J2.9@3078.74,4820.51 3131.21,4820.51 3177.62,4866.93 3222.72,4866.93 3269.14,4820.51 U5.18@3314.96,4820.51
$1N33304: J2.11 U5.22 | length 274.7
  Top Layer w10: J2.11@3078.74,5020.51 3131.21,5020.51 3177.62,5066.93 3222.72,5066.93 3269.14,5020.51 U5.22@3314.96,5020.51
$1N33305: J2.12 U5.24 | length 274.7
  Top Layer w10: J2.12@3078.74,5120.51 3131.21,5120.51 3177.62,5166.93 3222.72,5166.93 3269.14,5120.51 U5.24@3314.96,5120.51
$1N33306: J2.13 U5.26 | length 274.7
  Top Layer w10: J2.13@3078.74,5220.51 3131.21,5220.51 3177.62,5266.93 3216.08,5266.93 3262.49,5220.51 U5.26@3314.96,5220.51
$1N33307: J2.14 U5.28 | length 274.7
  Top Layer w10: J2.14@3078.74,5320.51 3131.21,5320.51 3177.62,5366.93 3222.72,5366.93 3269.14,5320.51 U5.28@3314.96,5320.51
$1N33309: J2.16 U5.32 | length 274.7
  Top Layer w10: J2.16@3078.74,5520.51 3131.21,5520.51 3177.62,5566.93 3222.72,5566.93 3269.14,5520.51 U5.32@3314.96,5520.51
$1N33311: J2.18 U5.36 | length 274.7
  Top Layer w10: J2.18@3078.74,5720.51 3131.21,5720.51 3177.62,5766.93 3222.72,5766.93 3269.14,5720.51 U5.36@3314.96,5720.51
$1N33313: J2.20 U5.40 | length 276
  Top Layer w10: J2.20@3078.74,5920.51 3126.74,5968.51 3256.5,5968.51 3304.5,5920.51 U5.40@3314.96,5920.51
$1N33319: C20.2 Q1.1 R11.2
$1N33335: C6.1 R28.1 U8.7 U8.8 | length 136.2
  Bottom Layer w10: U8.7@3700.34,4221.67 U8.8@3720.03,4221.67 C6.1@3774.5,4221.67 R28.1@3836.5,4221.67